# Altium PCB AudioMoth-v1.3.PcbDoc (part 1 of 4)
Units mil, origin at the board's own origin, x right, y up, seen from the top; angles counter-clockwise.
Board outline 4924.42 x 1891.72 mil, 4 copper layers (Top Layer, Layer 1, Layer 2, Bottom Layer), stack 61.651 mil thick; 157 components, 143 nets, 670 pads, 350 vias.
Unrouted connection lines stored in the file: 32.
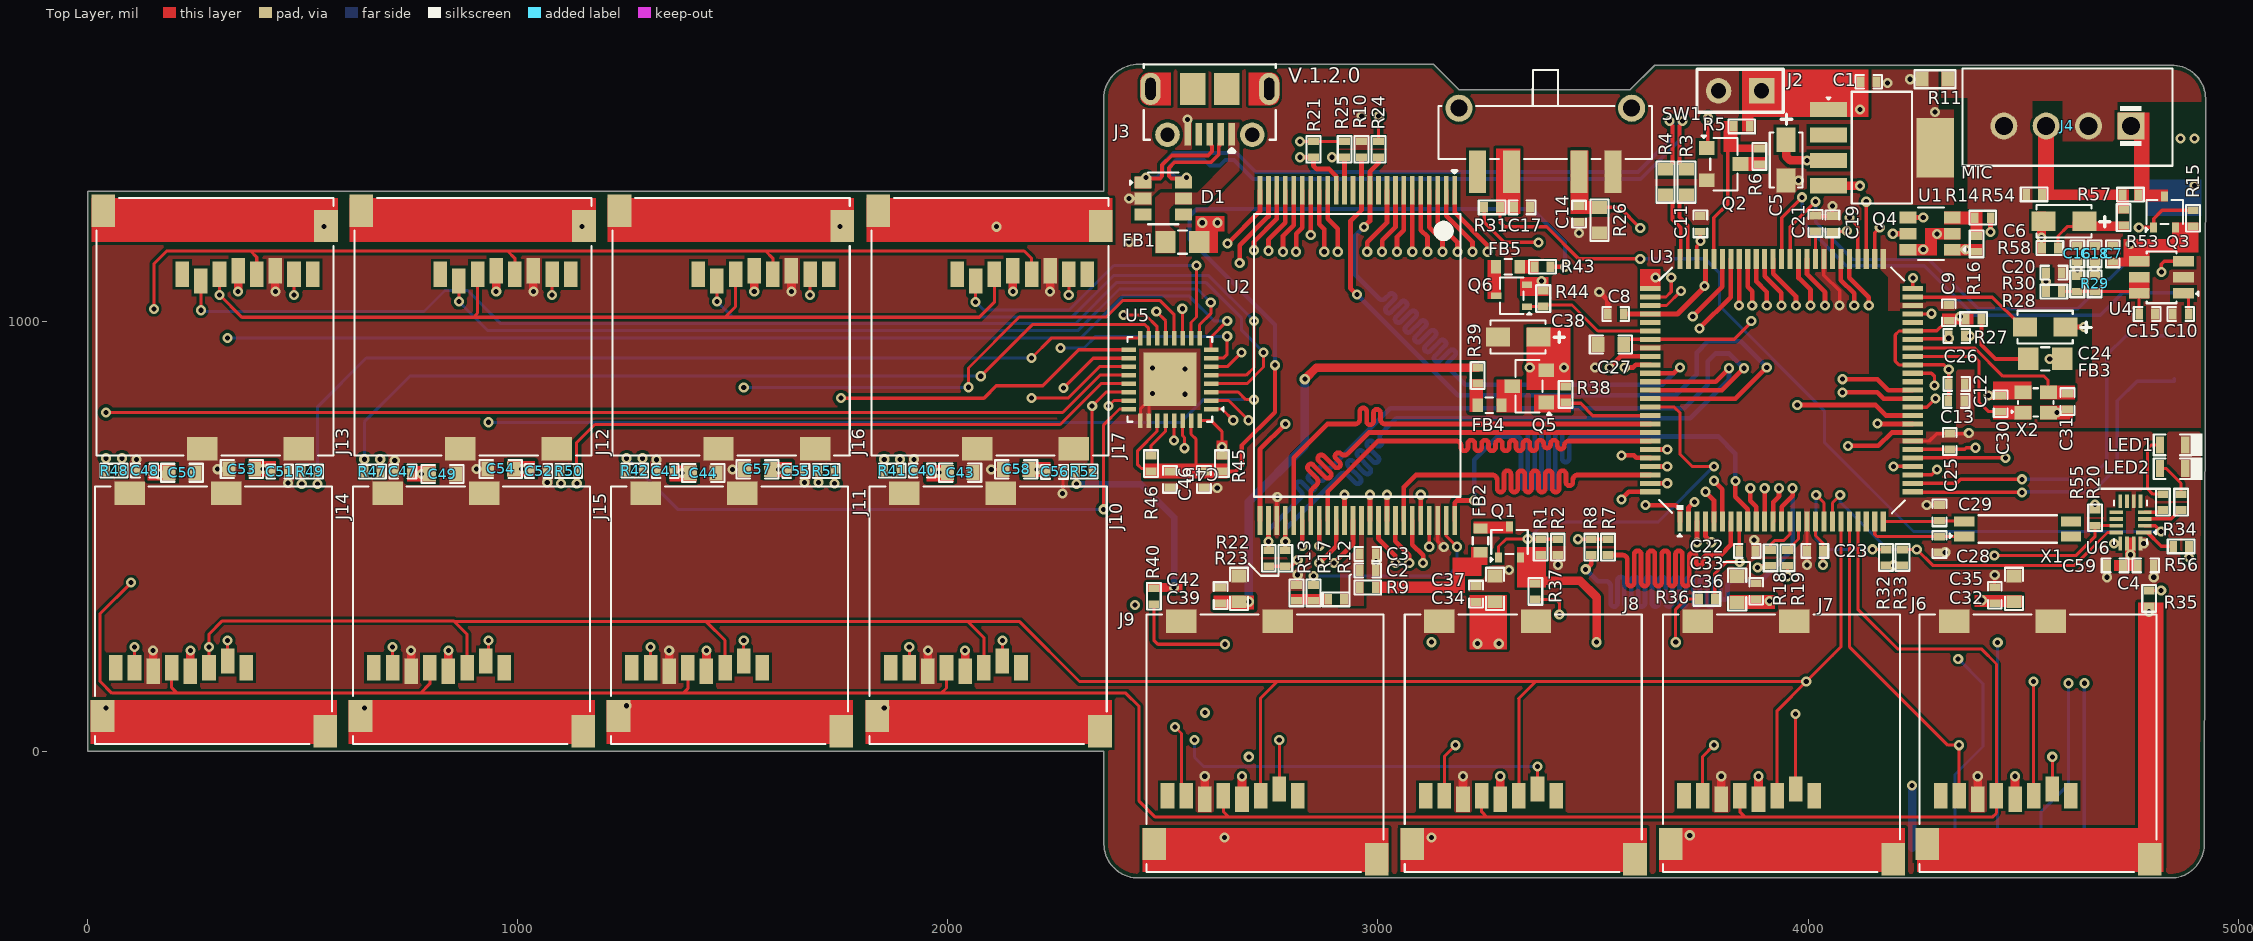
[diagram p0: Top Layer view]
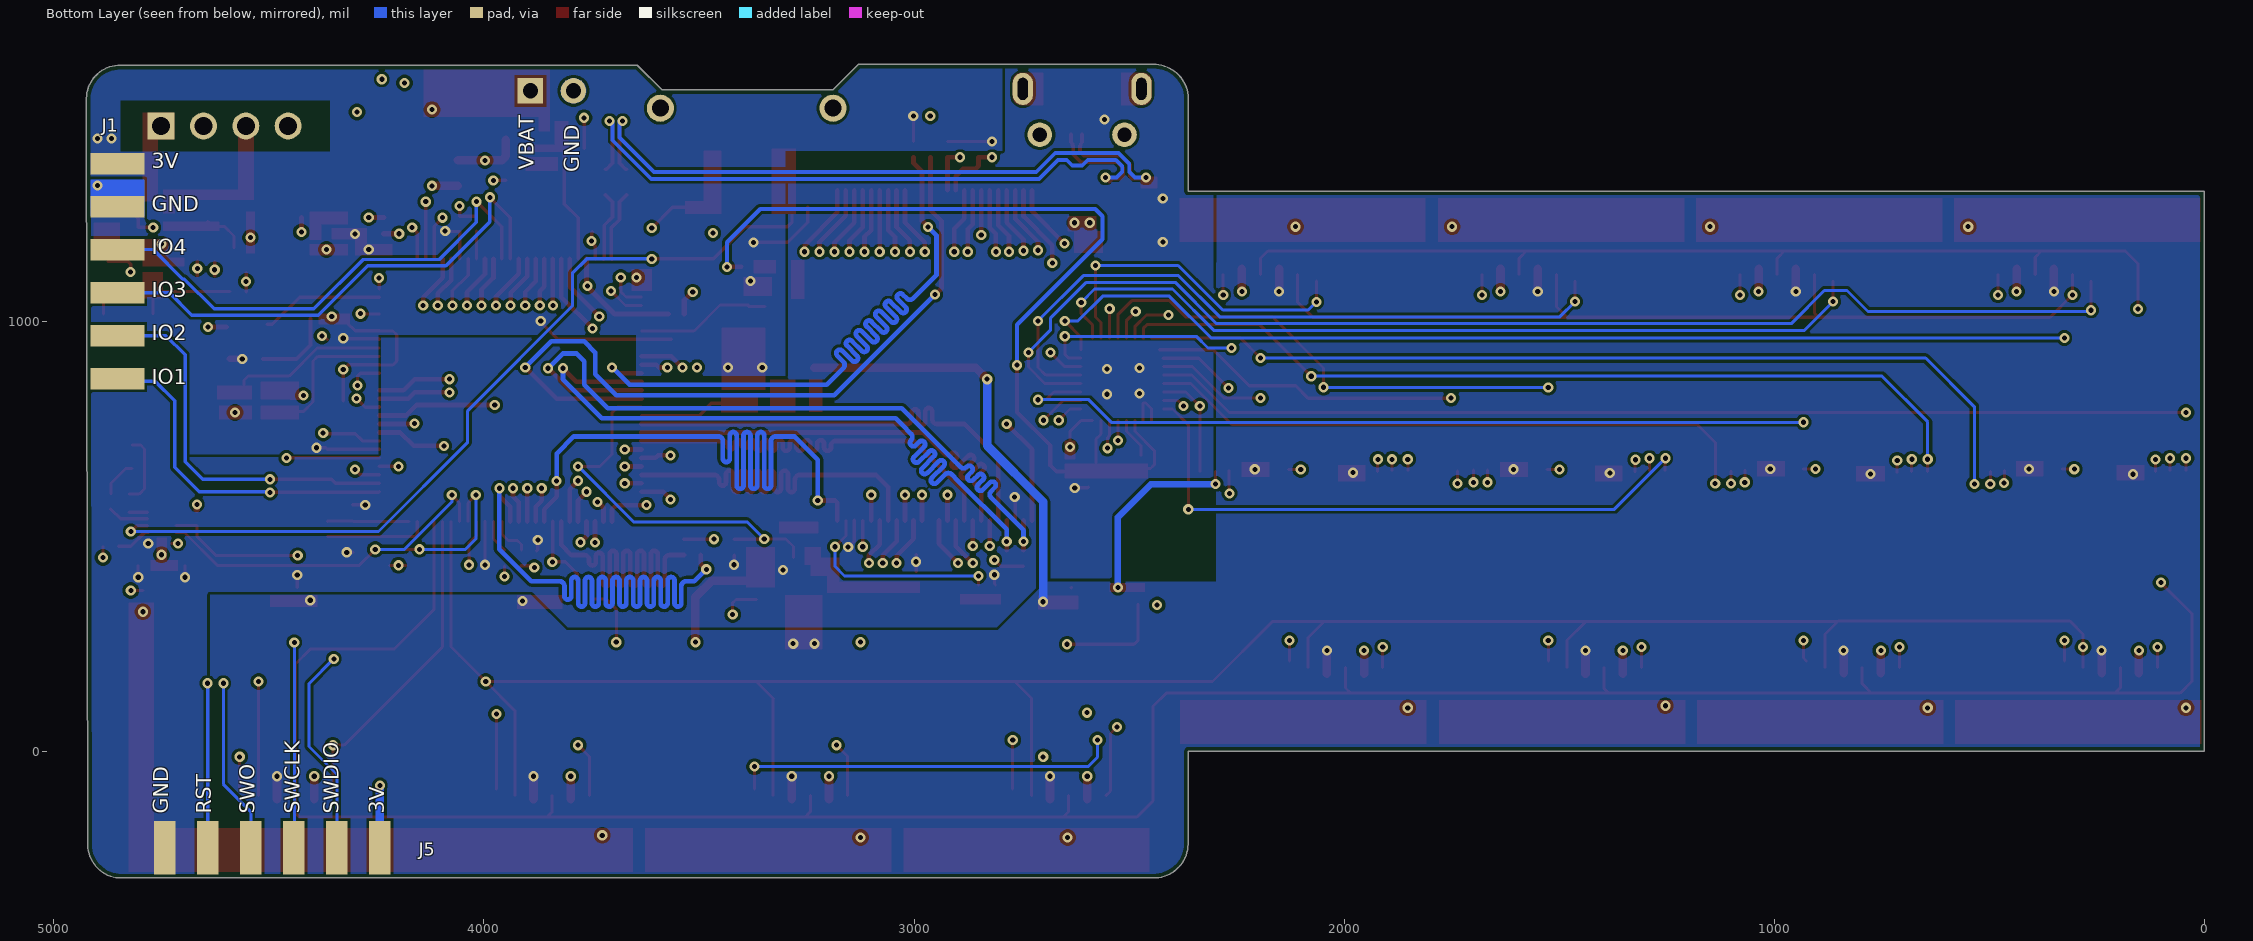
[diagram p1: Bottom Layer view, seen from below]
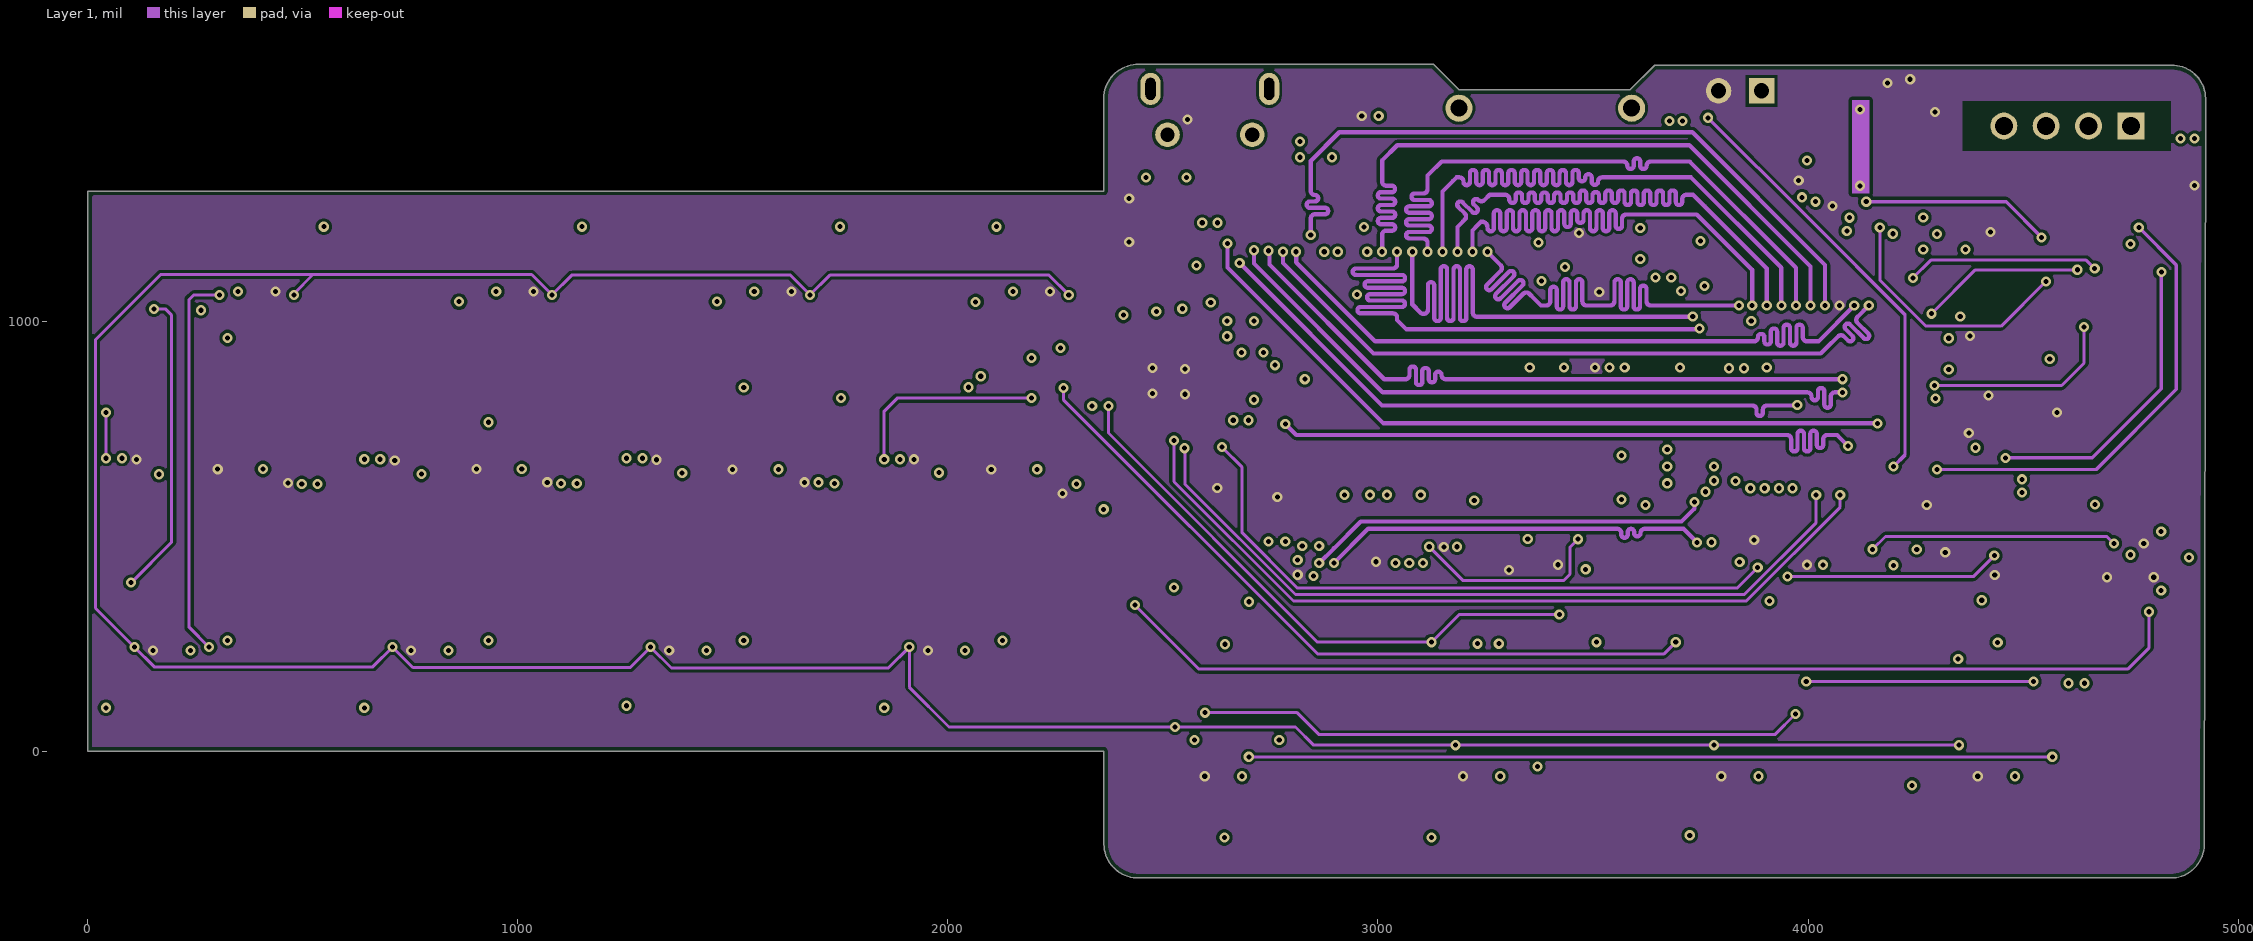
[diagram p2: Layer 1]
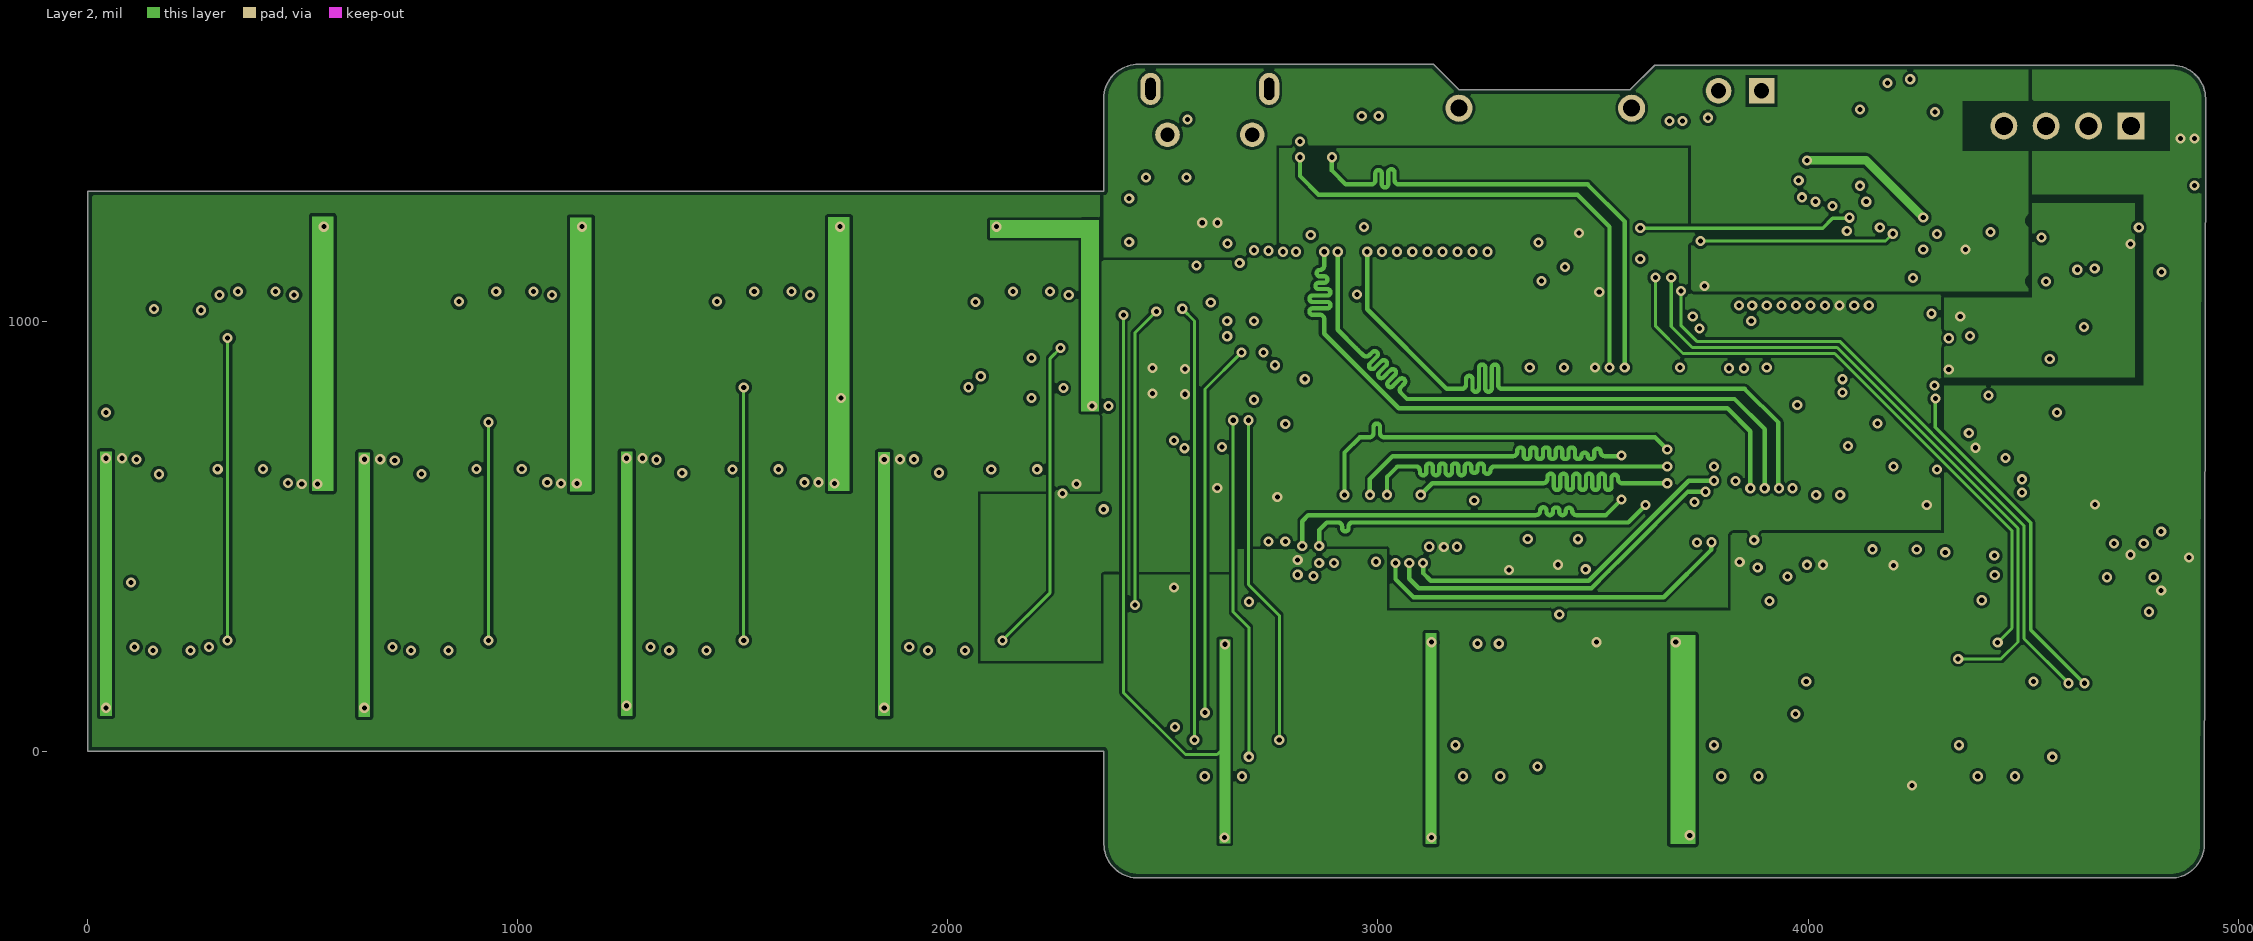
[diagram p3: Layer 2]
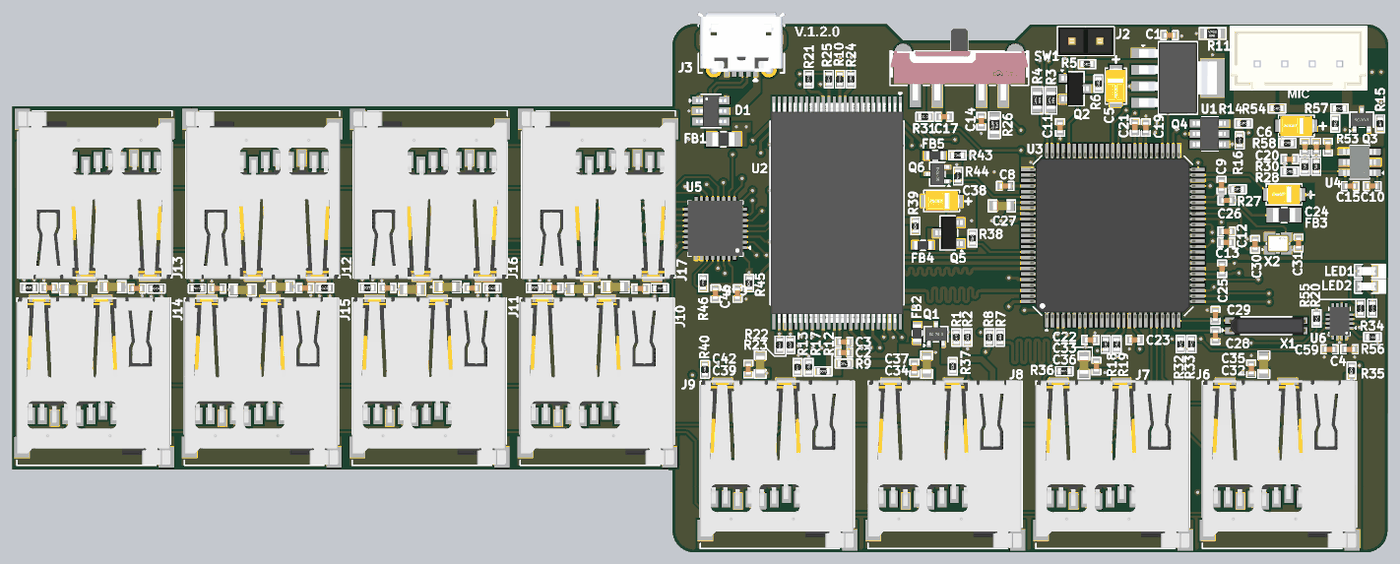
[diagram p6: 3D render of the assembled board from above, using the file's embedded part models]

## Layer stack, top to bottom
Top Solder: solder mask 0.787, Solder Resist, Dk 3.5
Top Layer: signal copper 1.378
Dielectric 2: prepreg 7.992, PP-006, Dk 4.1
Layer 1: signal copper 1.18
Dielectric 1: core 40.551, FR-4, Dk 4.8
Layer 2: signal copper 1.18
Dielectric 3: prepreg 7.992, PP-006, Dk 4.1
Bottom Layer: signal copper 1.378
Bottom Solder: solder mask 0.787, Solder Resist, Dk 3.5

## Board outline
0.4,0 2362.61,0 2362.61,-215.75 ccw(c2442.92,-214.17) 2444.5,-294.49 4841.65,-294.49 ccw(c4843.03,-216.34) 4921.18,-217.72 4924.31,1518.5 ccw(c4846.16,1517.12) 4844.78,1595.27 3643.32,1595.27 3586.23,1538.18 3188.59,1538.18 3129.53,1597.24 2443.99,1597.24 ccw(c2442.42,1516.92) 2362.1,1518.5 2362.1,1302.76 -0.1,1302.76

## Design rules (kind name [scope] priority, off if disabled: settings)
BoardOutlineClearance [All] p1: gap=0 ignorepadtopadclearanceinfootprint=FALSE except(10: Poly-OutlineEdge)
Clearance [All] p1: gap=7 ignorepadtopadclearanceinfootprint=TRUE except(0: Arc-Hole Track-Hole SMDPad-Hole THPad-Hole Via-Hole Fill-Hole Poly-Hole Region-Hole Text-Hole; 4: Arc-SMDPad Track-SMDPad SMDPad-SMDPad)
DiffPairsRouting [InDifferentialPairClass('USB_PROGRAM_LINES')] p1: maxlimit=7 minlimit=7 mostfreqgap=7 toplayer_minwidth=9 toplayer_maxwidth=9 toplayer_prefwidth=9 midlayer1_minwidth=7 midlayer1_maxwidth=7 midlayer1_prefwidth=7 midlayer2_minwidth=7 midlayer2_maxwidth=7 midlayer2_prefwidth=7 bottomlayer_minwidth=9 bottomlayer_maxwidth=9 bottomlayer_prefwidth=9 impedanceprofiledriven=TRUE impedanceprofileid={D0EDEC38-AB3E-4046-B400-208FF55D4031} impedanceprofilevalue=90.000000 maxuncoupledlength=500
HoleToHoleClearance [All] p1: gap=0 allowstackedmicrovias=TRUE
MatchedLengths "Schematic Matched Net Lengths" [InNetClass('USB_PROGRAM')] p1: tolerance=50 checknetsindiffpair=TRUE checkdiffpairvsdiffpair=FALSE checkxsignals=FALSE checkothers=FALSE
MaxMinImpedance "Schematic Impedance Constraint" [InNetClass('USB_PROGRAM')] p1: minimum=85.00 maximum=90.00
MinimumSolderMaskSliver [All] p1: minsoldermaskwidth=0
PolygonConnect [All] p1: connectstyle=Direct reliefconductorwidth=10 reliefentries=4 polygonreliefangle="90 Angle" airgapwidth=10
RoutingVias [All] p1: holewidth=11.81 width=23.62 viastyle="Through Hole" minholewidth=11.81 minwidth=23.62 maxholewidth=11.81 maxwidth=23.62
SilkToSilkClearance [All] p1: silktosilkclearance=0
SilkToSolderMaskClearance [IsPad] p1: minsilkscreentomaskgap=0 clearancetoexposedcopper=TRUE
SolderMaskExpansion [All] p1: expansion=4 istentingtop=FALSE
UnRoutedNet [All] p1: checkbadconnections=TRUE
Width Enable_lines [InNetClass('Enable_inputs')] p1: maxlimit=11 minlimit=9.9 preferedwidth=11 toplayer_minwidth=11 midlayer1_maxwidth=9.9 midlayer1_prefwidth=9.9 midlayer2_maxwidth=9.9 midlayer2_prefwidth=9.9 bottomlayer_minwidth=11 impedanceprofiledriven=TRUE impedanceprofileid={AF320795-CAEE-4F7B-B9B2-C18B4CC6FF60} impedanceprofilevalue=50.000000 minimp=50.000000 maximp=50.000000 favimp=50.000000
Width Byte_Control [InNetClass('Byte_control')] p2: maxlimit=11 minlimit=9.9 preferedwidth=11 toplayer_minwidth=11 midlayer1_maxwidth=9.9 midlayer1_prefwidth=9.9 midlayer2_maxwidth=9.9 midlayer2_prefwidth=9.9 bottomlayer_minwidth=11 impedanceprofiledriven=TRUE impedanceprofileid={AF320795-CAEE-4F7B-B9B2-C18B4CC6FF60} impedanceprofilevalue=50.000000 minimp=50.000000 maximp=50.000000 favimp=50.000000
Width Data_Lines [InNetClass('Data_Lines')] p3: maxlimit=11 minlimit=9.9 preferedwidth=11 toplayer_minwidth=11 midlayer1_maxwidth=9.9 midlayer1_prefwidth=9.9 midlayer2_maxwidth=9.9 midlayer2_prefwidth=9.9 bottomlayer_minwidth=11 impedanceprofiledriven=TRUE impedanceprofileid={AF320795-CAEE-4F7B-B9B2-C18B4CC6FF60} impedanceprofilevalue=50.000000 minimp=50.000000 maximp=50.000000 favimp=50.000000
Width Address_Lines_1 [InNetClass('Address_lines')] p4: maxlimit=11 minlimit=9.9 preferedwidth=11 toplayer_minwidth=11 midlayer1_maxwidth=9.9 midlayer1_prefwidth=9.9 midlayer2_maxwidth=9.9 midlayer2_prefwidth=9.9 bottomlayer_minwidth=11 impedanceprofiledriven=TRUE impedanceprofileid={AF320795-CAEE-4F7B-B9B2-C18B4CC6FF60} impedanceprofilevalue=50.000000 minimp=50.000000 maximp=50.000000 favimp=50.000000
Width [All] p5: maxlimit=40 minlimit=7 preferedwidth=7
24 further rules are at their usual default settings.

## Classes and differential pairs
differential pair class USB_PROGRAM_LINES: CPU_USB#_D CPU_USB_D
net class USB_PROGRAM: CPU_USB#_D_N CPU_USB#_D_P CPU_USB_D_N CPU_USB_D_P
component class Sheet2: C4 C32 C33 C34 C35 C36 C37 C38 C39 C40 C41 C42 C43 C44 C45 C46 C47 C48 C49 C50 C51 C52 C53 C54 C55 C56 C57 C58 C59 FB4 FB5 J6 J7 J8 J9 J10 J11 J12 J13 J14 J15 J16 J17 LED1 LED2 Q5 Q6 R20 R34 R35 R36 R37 R38 R39 R40 R41 R42 R43 R44 R45 R46 R47 R48 R49 R50 R51 R52 R55 R56 U5 U6
component class Sheet1: C1 C2 C3 C5 C6 C7 C8 C9 C10 C11 C12 C13 C14 C15 C16 C17 C18 C19 C20 C21 C22 C23 C24 C25 C26 C27 C28 C29 C30 C31 D1 FB1 FB2 FB3 J1 J2 J3 J4 J5 Q1 Q2 Q3 Q4 R1 R2 R3 R4 R5 R6 R7 R8 R9 R10 R11 R12 R13 R14 R15 R16 R17 R18 R19 R21 R22 R23 R24 R25 R26 R27 R28 R29 R30 R31 R32 R33 R53 R54 R57 R58 SW1 U1 U2 U3 U4 X1 X2
differential pair CPU_USB#_D: +CPU_USB#_D_P -CPU_USB#_D_N
differential pair CPU_USB_D: +CPU_USB_D_P -CPU_USB_D_N

## Components (designator, comment, footprint, x,y, rotation, side; value= is the part's Value field where it differs from the comment)
C1 "1uF" Cap-0402 4140.87,1556.78 r180 top
C2 "0.1uF" Cap-0402 2976.37,420.39 r0 top
C3 "0.1uF" Cap-0402 2976.37,458.78 r0 top
C4 "100nF" cap-0402 4785.29,432.32 r180 top
C5 "10uF" Case-A 3948.87,1374.78 r270 top
C6 "10uF" Case-A 4594.98,1232.4 r180 top
C7 "1uF" Cap-0402 4708.43,1156.71 r270 top
C8 "4.7uF" Cap-0402 3552.9,1016.89 r0 top
C9 "10nF" Cap-0402 4327,1019.57 r270 top
C10 "1uF" Cap-0402 4866.44,1016.8 r0 top
C11 "1uF" Cap-0402 3749.54,1226.31 r270 top
C12 "10nF" Cap-0402 4345.5,854.31 r180 top
C13 "10nF" Cap-0402 4344.36,814.94 r180 top
C14 "1uF" Cap-0402 3467.62,1249.3 r90 top
C15 "1uF" Cap-0402 4788.35,1016.8 r180 top
C16 "10nF" Cap-0402 4625.99,1156.71 r270 top
C17 "1uF" Cap-0402 3334.91,1264.81 r180 top
C18 "10nF" Cap-0402 4666.37,1156.71 r270 top
C19 "100nF" cap-0402 4056.59,1226.14 r270 top
C20 "10nF" Cap-0402 4571.48,1112.92 r180 top
C21 "1uF" Cap-0402 4017.22,1227.34 r270 top
C22 "100nF" cap-0402 3858.53,466.05 r180 top
C23 "100nF" cap-0402 4016.04,466.05 r0 top
C24 "10uF" Case-A 4551.32,986.57 r180 top
C25 "100nF" cap-0402 4329.36,720.42 r270 top
C26 "100nF" cap-0402 4345.5,965.71 r180 top
C27 "10uF" Cap-0603 3541.4,945.87 r0 top
C28 "9pF" Cap-0402 4305.5,481.27 r90 top
C29 "9pF" Cap-0402 4305.5,554.48 r270 top
C30 "7pF" Cap-0402 4447.56,808.17 r270 top
C31 "7pF" Cap-0402 4603.08,813.29 r90 top
C32 "100nF" cap-0402 4433.97,362.78 r270 top
C33 "100nF" cap-0402 3879.43,372.24 r270 top
C34 "100nF" cap-0402 3228.31,365.78 r270 top
C35 "10uF" Cap-0603 4478.5,377.78 r270 top
C36 "10uF" Cap-0603 3835.15,376.24 r270 top
C37 "10uF" Cap-0603 3272.28,377.78 r270 top
C38 "10uF" Case-A 3325.81,963.37 r180 top
C39 "100nF" cap-0402 2634.01,362.28 r270 top
C40 "100nF" cap-0402 1940.37,652.78 r0 top
C41 "100nF" cap-0402 1342.82,651.78 r0 top
C42 "10uF" Cap-0603 2676.87,377.78 r270 top
C43 "10uF" Cap-0603 2028.64,647.94 r180 top
C44 "10uF" Cap-0603 1431.18,646.94 r180 top
C45 "100nF" cap-0402 2516.24,632.1 r90 top
C46 "100nF" cap-0402 2595.18,632.1 r90 top
C47 "100nF" cap-0402 732.72,650.39 r0 top
C48 "100nF" cap-0402 132.24,652.69 r0 top
C49 "10uF" Cap-0603 824.87,644.78 r180 top
C50 "10uF" Cap-0603 219.32,647.68 r180 top
C51 "100nF" cap-0402 446.5,650.39 r180 top
C52 "100nF" cap-0402 1048.37,651.78 r180 top
C53 "10uF" Cap-0603 358.38,656.39 r0 top
C54 "10uF" Cap-0603 960.19,656.78 r0 top
C55 "100nF" cap-0402 1646.49,651.77 r180 top
C56 "100nF" cap-0402 2247.95,649.95 r180 top
C57 "10uF" Cap-0603 1557.14,655.78 r0 top
C58 "10uF" Cap-0603 2158.59,655.77 r0 top
C59 "100nF" cap-0402 4713.66,432.31 r0 top
D1 "IP4220CZ6,125" 6-TSOP 2500.8,1285.49 r0 top
FB1 "BLM21PG221SN1D" Ind-0805 2545.29,1184.1 r180 top
FB2 "BLM18HG601SN1D" "IND-0603 (1608 Metric)" 3238.31,490.56 r270 top
FB3 "CBW201209U102T" Ind-0805 4551.32,912.62 r0 top
FB4 "BLM18HG601SN1D" "IND-0603 (1608 Metric)" 3259.6,804.55 r180 top
FB5 "BLM18HG601SN1D" "IND-0603 (1608 Metric)" 3302.18,1126.78 r0 top
J1 "MA06-1SMD_BOARD_EDGE" TSM-106-X-SH-BOARDEDGE 4851.87,1116.78 r270 bottom
J2 "DNP" HDR1X2_ 3891.87,1535.78 r180 top
J3 "1050170001" 1050170001 2609.03,1487 r180 top locked
J4 "DNP" B4B-XH-A(LF)(SN). 4750.52,1454.02 r180 top
J5 "MA06-1SMD_BOARD_EDGE" TSM-106-X-SH-BOARDEDGE 4491.87,-224.22 r0 bottom
J6 "693071010811" 693071010811 4535.73,25.71 r0 top
J7 "693071010811" 693071010811 3939.27,25.71 r0 top
J8 "693071010811" 693071010811 3338.83,25.71 r0 top
J9 "693071010811" 693071010811 2738.4,25.71 r0 top
J10 "693071010811" 693071010811 2094.61,323.31 r0 top
J11 "693071010811" 693071010811 1493.16,323.31 r0 top
J12 "693071010811" 693071010811 893.16,323.31 r0 top
J13 "693071010811" 693071010811 293.16,323.31 r0 top
J14 "693071010811" 693071010811 295.16,980.31 r180 top
J15 "693071010811" 693071010811 895.16,980.31 r180 top
J16 "693071010811" 693071010811 1495.16,980.31 r180 top
J17 "693071010811" 693071010811 2096.61,980.31 r180 top
LED1 "RED" LED-0603 4847.77,712.57 r0 top
LED2 "Emerald" LED-0603 4847.77,657.24 r0 top
Q1 "LBSS84WT1G" SC-70 3305.87,486.78 r0 top
Q2 "BSS123" SOT-23 3803.59,1365.23 r270 top
Q3 "LBSS84WT1G" SC-70 4829,1254 r0 top
Q4 "FDC6420C" SuperSOT-6 4283.98,1203.5 r180 top
Q5 "DMG3415U" SOT-23 3351.79,848.78 r90 top
Q6 "LBSS84WT1G" SC-70 3310.96,1059.43 r90 top
R1 "10K" Res-0402 3378.33,474.81 r90 top
R2 "DNP" Res-0402 3418,474.81 r90 top
R3 "15R" Res-0603 3717.36,1323.51 r90 top
R4 "15R" Res-0603 3668.2,1323.51 r90 top
R5 "49.9K" Res-0402 3845.96,1453.31 r0 top value=49.9kR
R6 "49.9K" Res-0402 3886.87,1383.37 r90 top value=49.9kR
R7 "DNP" Res-0402 3534.9,474.81 r90 top
R8 "0R" Res-0402 3495.9,474.81 r90 top
R9 "1R" Res-0402 2976.37,381.02 r0 top
R10 "10K" Res-0402 2961.71,1399.75 r270 top
R11 "0R" Res-0603 4295.19,1562.78 r0 top
R12 "DNP" Res-0402 2902.66,353.5 r180 top
R13 "0R" Res-0402 2810.6,368.5 r270 top
R14 "6.8K" Res-0402 4406.02,1240.9 r180 top
R15 "10K" Res-0402 4895,1239.5 r90 top
R16 "4.7K" Res-0402 4391.82,1179.87 r90 top
R17 "10K" Res-0402 2849.97,368.5 r90 top
R18 "0R" Res-0402 3912.89,449.77 r90 top
R19 "0R" Res-0402 3952.26,449.78 r90 top
R20 "240R" Res-0402 4824.94,579.53 r90 top
R21 "10K" Res-0402 2849.95,1399.75 r270 top
R22 "10K" Res-0402 2746.09,448.76 r90 top
R23 "10K" Res-0402 2784.55,448.76 r90 top
R24 "10K" Res-0402 3001.08,1399.75 r270 top
R25 "10K" Res-0402 2922.34,1399.75 r270 top
R26 "270K" Res-0603 3514.87,1234.81 r90 top
R27 "1R" Res-0402 4384.86,1005.07 r180 top
R28 "1R" Res-0402 4626,1086.82 r270 top
R29 "1R" Res-0402 4666.37,1086.82 r270 top
R30 "1R" Res-0402 4571.48,1068.99 r0 top
R31 "10K" Res-0402 3265.18,1264.81 r180 top
R32 "4.7K" Res-0402 4181.15,451.05 r90 top
R33 "4.7K" Res-0402 4219.48,451.05 r90 top
R34 "133R" Res-0402 4867.31,579.53 r90 top
R35 "10K" Res-0402 4793,355.5 r270 top
R36 "10K" Res-0402 3764.9,354.5 r180 top
R37 "10K" Res-0402 3365.83,371.78 r270 top
R38 "10K" Res-0402 3436.44,830.05 r270 top
R39 "1R" Res-0402 3232.04,873.58 r270 top
R40 "10K" Res-0402 2478.87,360.78 r270 top
R41 "10K" Res-0402 1870.47,652.78 r180 top
R42 "10K" Res-0402 1271.83,652.78 r180 top
R43 "10K" Res-0402 3384.4,1052.84 r270 top
R44 "1R" Res-0402 3382.5,1126.78 r180 top
R45 "10K" Res-0402 2637.05,669.1 r270 top
R46 "10K" Res-0402 2472.35,669.1 r270 top
R47 "10K" Res-0402 661.86,650.39 r180 top
R48 "10K" Res-0402 61.37,652.69 r180 top
R49 "10K" Res-0402 515.75,650.39 r0 top
R50 "10K" Res-0402 1118.37,651.78 r0 top
R51 "10K" Res-0402 1717.36,651.77 r0 top
R52 "10K" Res-0402 2317,650.6 r0 top
R53 "0R" Res-0402 4733.85,1240.9 r90 top
R54 "DNP" Res-0402 4525.62,1294.95 r0 top
R55 "10K" Res-0402 4667.41,543.14 r90 top
R56 "10K" Res-0402 4867.31,476.56 r0 top
R57 "DNP" Res-0402 4749.35,1294.33 r0 top
R58 "DNP" Res-0402 4562.48,1170.37 r180 top
SW1 "SSSS711403" SSSS711403 3389.06,1421.52 r180 top locked
U1 "LP38692MPX-3.3/NOPB" SOT-223-5 4171.47,1403.48 r270 top
U2 "IS62WV102416DBLL-55TLI-TR" "48-TSOP I" 2951.87,920.78 r270 top
U3 "EFM32WG380F256-B-QFP100R" EFM32WG380F256-B-QFP100R 3938.48,839.72 r90 top
U4 "MAX6070BAUT25+T" SOT-23-6 4821.43,1102 r180 top
U5 "TCA6424ARGJR" "32-UQFN (5x5)" 2516.24,864.78 r180 top
U6 "TCA6408ARSVR" "16-UQFN (2.6x1.8)" 4749.55,532.52 r180 top
X1 "32.768 KHz" MC-146_ 4487.5,516.98 r0 top
X2 "48 MHz" SMD2016-4P 4529.45,811.32 r0 top

## Footprints (in the part's own frame and the unit in brackets; to place one, negate y for a bottom-side part, rotate by r counter-clockwise, add the part's x,y. Pads: shape width x height; smd on the part's side, far side on the other; paste and mask are expansions set on the pad)
6-TSOP [mm]
  rect 1x0.7 smd paste+0 mask+0.051: 1(-1.2,0.95) 2(-1.2,0) 3(-1.2,-0.95) 4(1.2,-0.95) 5(1.2,0) 6(1.2,0.95)
  silkscreen extent -1.96,-1.52 0.9,1.52, body extent -1.38,-1.45 1.38,1.45, height 1.1
"16-UQFN (2.6x1.8)" [mm]
  rect 0.91x0.22 smd mask+0.07: 1(-0.795,0.6)
  rect 0.81x0.22 smd mask+0.07: 2(-0.845,0.2) 3(-0.845,-0.2) 4(-0.845,-0.6) 9(0.845,-0.6) 10(0.845,-0.2) 11(0.845,0.2) 12(0.845,0.6)
  rect 0.22x0.81 smd mask+0.07: 5(-0.6,-1.245) 6(-0.2,-1.245) 7(0.2,-1.245) 8(0.6,-1.245) 13(0.6,1.245) 14(0.2,1.245) 15(-0.2,1.245) 16(-0.6,1.245)
  silkscreen extent -1.51,-1.27 0.98,1.27, body extent -0.9,-1.3 0.9,1.3, height 0.55
"32-UQFN (5x5)" [mm]
  rect 0.86x0.27 smd: 1(-2.435,1.75) 2(-2.435,1.25) 3(-2.435,0.75) 4(-2.435,0.25) 5(-2.435,-0.25) 6(-2.435,-0.75) 7(-2.435,-1.25) 8(-2.435,-1.75) 17(2.435,-1.75) 18(2.435,-1.25) 19(2.435,-0.75) 20(2.435,-0.25) 21(2.435,0.25) 22(2.435,0.75) 23(2.435,1.25) 24(2.435,1.75)
  rect 0.27x0.86 smd: 9(-1.75,-2.435) 10(-1.25,-2.435) 11(-0.75,-2.435) 12(-0.25,-2.435) 13(0.25,-2.435) 14(0.75,-2.435) 15(1.25,-2.435) 16(1.75,-2.435) 25(1.75,2.435) 26(1.25,2.435) 27(0.75,2.435) 28(0.25,2.435) 29(-0.25,2.435) 30(-0.75,2.435) 31(-1.25,2.435) 32(-1.75,2.435)
  rect 3.15x3.15 smd paste-3: 33(0,0)
  silkscreen extent -3.17,-2.5 2.5,2.5, body extent -2.5,-2.5 2.5,2.5, height 0.6
"48-TSOP I" [mm]
  rect 1.7x0.28 smd paste+0 mask+0.051: 1(-9.75,5.75) 2(-9.75,5.25) 3(-9.75,4.75) 4(-9.75,4.25) 5(-9.75,3.75) 6(-9.75,3.25) 7(-9.75,2.75) 8(-9.75,2.25) 9(-9.75,1.75) 10(-9.75,1.25) 11(-9.75,0.75) 12(-9.75,0.25) 13(-9.75,-0.25) 14(-9.75,-0.75) 15(-9.75,-1.25) 16(-9.75,-1.75) 17(-9.75,-2.25) 18(-9.75,-2.75) 19(-9.75,-3.25) 20(-9.75,-3.75) 21(-9.75,-4.25) 22(-9.75,-4.75) 23(-9.75,-5.25) 24(-9.75,-5.75) 25(9.75,-5.75) 26(9.75,-5.25) 27(9.75,-4.75) 28(9.75,-4.25) 29(9.75,-3.75) 30(9.75,-3.25) 31(9.75,-2.75) 32(9.75,-2.25) 33(9.75,-1.75) 34(9.75,-1.25) 35(9.75,-0.75) 36(9.75,-0.25) 37(9.75,0.25) 38(9.75,0.75) 39(9.75,1.25) 40(9.75,1.75) 41(9.75,2.25) 42(9.75,2.75) 43(9.75,3.25) 44(9.75,3.75) 45(9.75,4.25) 46(9.75,4.75) 47(9.75,5.25) 48(9.75,5.75)
  silkscreen extent -10.9,-6.1 8.35,6.1, body extent -10,-6 10,6, height 1.25
1050170001 [mm]
  rect 0.4x1.35 smd mask+0.064: 1(-1.3,1.325) 2(-0.65,1.325) 3(0,1.325) 4(0.65,1.325) 5(1.3,1.325)
  round 1.45 hole 0.85 mask+0.064: SH1(-2.5,1.35) SH2(2.5,1.35)
  oval 1.2x1.9 hole 0.6 slot 1.3 at 90 deg mask+0: SH3(-3.5,-1.35) SH6(3.5,-1.35)
  rect 1.5x1.9 smd mask+0.064: SH4(-1,-1.35) SH5(1,-1.35)
  Top Layer region: 3.626,-0.401 3.652,-0.403 3.678,-0.406 3.704,-0.411 3.729,-0.417 3.755,-0.424 3.779,-0.433 3.803,-0.443 3.827,-0.454 3.85,-0.467 3.872,-0.481 3.894,-0.495 3.915,-0.511 3.935,-0.528 3.954,-0.546 3.972,-0.565 3.989,-0.585 4.005,-0.606 4.019,-0.628 4.033,-0.65 4.046,-0.673 4.057,-0.697 4.067,-0.721 4.076,-0.745 4.083,-0.771 4.089,-0.796 4.094,-0.822 4.097,-0.848 4.099,-0.874 4.1,-0.9 4.1,-1.8 4.099,-1.826 4.097,-1.852 4.094,-1.878 4.089,-1.904 4.083,-1.929 4.076,-1.955 4.067,-1.979 4.057,-2.003 4.046,-2.027 4.033,-2.05 4.019,-2.072 4.005,-2.094 3.989,-2.115 3.972,-2.135 3.954,-2.154 3.935,-2.172 3.915,-2.189 3.894,-2.205 3.872,-2.219 3.85,-2.233 3.827,-2.246 3.803,-2.257 3.779,-2.267 3.755,-2.276 3.729,-2.283 3.704,-2.289 3.678,-2.294 3.652,-2.297 3.626,-2.299 3.6,-2.3 2.3,-2.3 2.3,-0.4 3.6,-0.4
  Top Layer region: -2.3,-2.3 -3.6,-2.3 -3.626,-2.299 -3.652,-2.297 -3.678,-2.294 -3.704,-2.289 -3.729,-2.283 -3.755,-2.276 -3.779,-2.267 -3.803,-2.257 -3.827,-2.246 -3.85,-2.233 -3.872,-2.219 -3.894,-2.205 -3.915,-2.189 -3.935,-2.172 -3.954,-2.154 -3.972,-2.135 -3.989,-2.115 -4.005,-2.094 -4.019,-2.072 -4.033,-2.05 -4.046,-2.027 -4.057,-2.003 -4.067,-1.979 -4.076,-1.955 -4.083,-1.929 -4.089,-1.904 -4.094,-1.878 -4.097,-1.852 -4.099,-1.826 -4.1,-1.8 -4.1,-0.9 -4.099,-0.874 -4.097,-0.848 -4.094,-0.822 -4.089,-0.796 -4.083,-0.771 -4.076,-0.745 -4.067,-0.721 -4.057,-0.697 -4.046,-0.673 -4.033,-0.65 -4.019,-0.628 -4.005,-0.606 -3.989,-0.585 -3.972,-0.565 -3.954,-0.546 -3.935,-0.528 -3.915,-0.511 -3.894,-0.495 -3.872,-0.481 -3.85,-0.467 -3.827,-0.454 -3.803,-0.443 -3.779,-0.433 -3.755,-0.424 -3.729,-0.417 -3.704,-0.411 -3.678,-0.406 -3.652,-0.403 -3.626,-0.401 -3.6,-0.4 -2.3,-0.4
  silkscreen extent -3.9,-2.8 3.9,2.36, body extent -4,-3.84 4,1.56, height 2.75
693071010811 [mm]
  rect 0.8x1.5 smd paste+0 mask+0.05: 1(1.915,-3.275) 2(0.815,-2.875) 3(-0.285,-3.275) 4(-1.385,-3.475) 5(-2.485,-3.275) 6(-3.585,-3.475) 7(-4.685,-3.275) 8(-5.785,-3.275)
  rect 1.4x1.9 smd paste+0 mask+0.05: 9(-6.575,-6.125) 9(6.575,-7.025)
  rect 1.8x1.4 smd paste+0 mask+0.05: 10(-4.975,7.025) 10(0.725,7.025)
  silkscreen extent -7.02,-7.77 6.97,7.43, body extent -7.06,-7.69 6.94,7.51, height 1.83
B4B-XH-A(LF)(SN). [mm]
  rect 1.59x1.59 hole 1.06: 1(0,0)
  round 1.59 hole 1.06: 2(2.5,0) 3(5,0) 4(7.5,0)
  silkscreen extent -2.45,-3.4 9.95,2.35, body extent -2.45,-3.4 9.95,2.35, height 7
Cap-0402 [mil]
  rect 18x25 smd mask+2.36: 1(-18.5,0) 2(18.5,0)
  silkscreen extent -31,-16 31,16, body extent -20,-10 20,10, height 19
cap-0402 [mil]
  rect 18x25 smd mask+2.36: 1(-18.5,0) 2(18.5,0)
  silkscreen extent -31,-16 31,16, body extent -20,-10 20,10, height 19
Cap-0603 [mil]
  rect 30x35 smd mask+2.36: 1(-30,0) 2(30,0)
  silkscreen extent -49,-21 49,21, body extent -32,-16 31,16, height 34
Case-A [mm]
  rect 1.42x1.13 smd: 1(-1.2,0) 2(1.2,0)
  silkscreen extent -2.72,-0.97 1.63,0.97, body extent -1.6,-0.9 1.6,0.9, height 1.8
EFM32WG380F256-B-QFP100R [mm]
  rect 1.2x0.3 smd: 1(-7.75,6) 2(-7.75,5.5) 3(-7.75,5) 4(-7.75,4.5) 5(-7.75,4) 6(-7.75,3.5) 7(-7.75,3) 8(-7.75,2.5) 9(-7.75,2) 10(-7.75,1.5) 11(-7.75,1) 12(-7.75,0.5) 13(-7.75,0) 14(-7.75,-0.5) 15(-7.75,-1) 16(-7.75,-1.5) 17(-7.75,-2) 18(-7.75,-2.5) 19(-7.75,-3) 20(-7.75,-3.5) 21(-7.75,-4) 22(-7.75,-4.5) 23(-7.75,-5) 24(-7.75,-5.5) 25(-7.75,-6) 51(7.75,-6) 52(7.75,-5.5) 53(7.75,-5) 54(7.75,-4.5) 55(7.75,-4) 56(7.75,-3.5) 57(7.75,-3) 58(7.75,-2.5) 59(7.75,-2) 60(7.75,-1.5) 61(7.75,-1) 62(7.75,-0.5) 63(7.75,0) 64(7.75,0.5) 65(7.75,1) 66(7.75,1.5) 67(7.75,2) 68(7.75,2.5) 69(7.75,3) 70(7.75,3.5) 71(7.75,4) 72(7.75,4.5) 73(7.75,5) 74(7.75,5.5) 75(7.75,6)
  rect 0.3x1.2 smd: 26(-6,-7.75) 27(-5.5,-7.75) 28(-5,-7.75) 29(-4.5,-7.75) 30(-4,-7.75) 31(-3.5,-7.75) 32(-3,-7.75) 33(-2.5,-7.75) 34(-2,-7.75) 35(-1.5,-7.75) 36(-1,-7.75) 37(-0.5,-7.75) 38(0,-7.75) 39(0.5,-7.75) 40(1,-7.75) 41(1.5,-7.75) 42(2,-7.75) 43(2.5,-7.75) 44(3,-7.75) 45(3.5,-7.75) 46(4,-7.75) 47(4.5,-7.75) 48(5,-7.75) 49(5.5,-7.75) 50(6,-7.75) 76(6,7.75) 77(5.5,7.75) 78(5,7.75) 79(4.5,7.75) 80(4,7.75) 81(3.5,7.75) 82(3,7.75) 83(2.5,7.75) 84(2,7.75) 85(1.5,7.75) 86(1,7.75) 87(0.5,7.75) 88(0,7.75) 89(-0.5,7.75) 90(-1,7.75) 91(-1.5,7.75) 92(-2,7.75) 93(-2.5,7.75) 94(-3,7.75) 95(-3.5,7.75) 96(-4,7.75) 97(-4.5,7.75) 98(-5,7.75) 99(-5.5,7.75) 100(-6,7.75)
  silkscreen extent -8.64,-7.27 7.24,7.24, body extent -8,-8 8,8, height 1.6
HDR1X2_ [mm] "CONN HEADER VERT 2POS 2.54MM"
  rect 1.5x1.5 hole 0.9: 1(0,0)
  round 1.5 hole 0.9: 2(2.54,0)
  silkscreen extent -1.27,-1.27 3.81,1.27, body extent -1.27,-1.27 3.81,1.27, height 8.44
"IND-0603 (1608 Metric)" [mm] "0.063\" L x 0.032\" W (1.60mm x 0.80mm)"
  rect 0.6x0.8 smd: 1(-0.7,0) 2(0.7,0)
  silkscreen extent -0.2,-0.46 0.23,0.46, body extent -0.8,-0.4 0.8,0.4, height 0.78
Ind-0805 [mm] "Inductor 0805"
  rect 1.2x1.32 smd: 1(-1,0) 2(1,0)
  silkscreen extent -0.25,-0.69 0.25,0.69, body extent -1,-0.62 1,0.63, height 0.47
LED-0603 [mm]
  rect 0.5x1 smd: 1(-0.75,0) 2(0.75,0)
  silkscreen extent -1.12,-0.66 1.75,0.66, body extent -0.82,-0.37 0.82,0.36, height 0.68
MC-146_ [mm]
  rect 1.2x0.6 smd: 1(-3.15,-0.45) 2(3.15,-0.45) 3(3.15,0.45) 4(-3.15,0.45)
  silkscreen extent -4.01,-0.81 2.31,0.81, body extent -3.35,-0.75 3.55,0.75, height 1.45
Res-0402 [mil]
  rect 18x25 smd mask+2.17: 1(-18.5,0) 2(18.5,0)
  silkscreen extent -32,-17 32,16, body extent -23,-11 23,11, height 16
Res-0603 [mil]
  rect 30x35 smd: 1(-30,0) 2(30,0)
  silkscreen extent -48,-21 48,21, body extent -31,-17 31,17, height 18
SC-70 [mm]
  rect 0.4x0.6 smd paste+0 mask+0.051: 1(-0.65,-0.91) 2(0.65,-0.91) 3(0,0.91)
  silkscreen extent -1.11,-1.16 1.08,0.7, body extent -1,-1.05 1,1.05, height 1
SMD2016-4P [mm]
  rect 1x0.8 smd paste+0 mask+0.051: 1(-0.75,-0.6) 2(0.75,-0.6) 3(0.75,0.6) 4(-0.75,0.6)
  silkscreen extent -1.42,-0.84 1.04,0.84, body extent -1,-0.8 1,0.8, height 0.47
SOT-23 [mm] "TRANS NPN 40V 0.6A SOT23"
  rect 0.82x0.92 smd: 1(-0.95,-1) 2(0.95,-1) 3(0,1)
  silkscreen extent -1.68,-1.3 1.55,0.81, body extent -1.5,-1.25 1.5,1.25, height 1.05
SOT-23-6 [mm]
  rect 1.22x0.62 smd: 1(-1.31,0.95) 2(-1.31,0) 3(-1.31,-0.95) 4(1.31,-0.95) 5(1.31,0) 6(1.31,0.95)
  silkscreen extent -2.18,-1.52 0.86,1.52, body extent -1.5,-1.5 1.5,1.5, height 1.47
SOT-223-5 [mm]
  rect 0.9x2.2 smd paste+0 mask+0.051: 1(-2.25,-3.15) 2(-0.75,-3.15) 3(0.75,-3.15) 4(2.25,-3.15)
  rect 3.5x2.2 smd paste+0 mask+0.051: 5(0,3.15)
  silkscreen extent -3.3,-3.28 3.3,1.78, body extent -3.25,-3.52 3.25,3.52, height 1.8
SSSS711403 [mm]
  rect 1x2.5 smd paste-100 mask+0.051: 1(-4,1.875) 2(-2,1.875) 3(2,1.875) 4(4,1.875)
  round 1.6 hole 1 paste-2539.97 mask+0.051: 5(-5.1,-1.875) 6(5.1,-1.875)
  silkscreen extent -6.3,-4.14 6.3,1.12, body extent -6.25,-4 6.25,2.5, height 2.03
SuperSOT-6 [mm]
  rect 1x0.7 smd: 1(-1.3,0.95) 2(-1.3,0) 3(-1.3,-0.95) 4(1.3,-0.95) 5(1.3,0) 6(1.3,0.95)
  silkscreen extent -2.09,-1.55 0.71,1.55, body extent -1.5,-1.5 1.5,1.5, height 1.05
TSM-106-X-SH-BOARDEDGE [mil] "TSM-106-X-SH-BOARDEDGE"
  rect 50x125 smd: 1(-250,0) 2(-150,0) 3(-50,0) 4(50,0) 5(150,0) 6(250,0)

## Part data
C1 C7 C10 C11 C14 C15 C17 C21: library part CL05A105KA5NQNC, "CAP CER 1UF 25V X5R 0402", Case Code (Imperial)=0402, Case Code (Metric)=1005, Dielectric=X5R, LCSC Part Number=C52923, Manufacturer=Samsung, Max Operating Temperature=85°C, Min Operating Temperature=-55°C, Package Quantity=10000, Tolerance=10%, Voltage Rating=25V, Case/Package=0402, Category="Ceramic Capacitors", ComponentLink1Description=https://datasheet.ciiva.com/25720/cl05a105ka5nqnc-25720771.pdf?src-supplier=Digi-Key, ComponentLink1URL=https://datasheet.ciiva.com/25720/cl05a105ka5nqnc-25720771.pdf?src-supplier=Digi-Key, ComponentLink2Description=https://datasheet.ciiva.com/3777/cl05a105ka5nqnc-3777709.pdf?src-supplier=Arrow+Electronics, ComponentLink2URL=https://datasheet.ciiva.com/3777/cl05a105ka5nqnc-3777709.pdf?src-supplier=Arrow+Electronics, ComponentLink3Description=https://datasheet.ciiva.com/29198/459147-da-01-en-vs-kondensator-0402-29198339.pdf?src-supplier=Conrad, ComponentLink3URL=https://datasheet.ciiva.com/29198/459147-da-01-en-vs-kondensator-0402-29198339.pdf?src-supplier=Conrad, Construction=Flat, Depth=0.5mm, Height=0.5mm, Item Type=Capacitor, Lead Free="Lead Free", Length=1mm, Manufacturer Part Number=CL05A105KA5NQNC, Material=Ceramic, Mounting Technology="Surface Mount", Packaging="Tape and Reel", Pricing 1="10000=0.0256, 20000=0.0238, 30000=0.0228, 50000=0.0207, 100000=0.0175, 250000=0.0157 (USD)", Radiation Hardening=No, RoHS=Yes, RoHS Compliant=Yes, Series=CL, Stock 1=80000, Supplier 1="Arrow Electronics", Supplier Part Number 1=CL05A105KA5NQNC, Thickness=0.022inch, Width=0.02inch
C2 C3: library part CL05B104KB54PNC, "CAP CER 0.1UF 50V X7R 0402", LCSC Part Number=C307331, Manufacturer=Samsung, Supplier Part Number 1=1276-CL05B104KB54PNCDKR-ND, Item Type=Capacitor, Manufacturer Part Number=CL05B104KB54PNC, Pricing 1="1=0.1, 10=0.067, 50=0.0366, 100=0.0299, 500=0.02138, 1000=0.01681, 2500=0.01528, 5000=0.01406 (USD)", Stock 1=8594, Supplier 1=Digi-Key
C4 C19 C22 C23 C25 C26 C32 C33 C34 C39 C40 C41 C45 C46 C47 C48 C51 C52 C55 C56 C59: library part C1005X7R1H104KT000F, "CAP CER 0.1UF 50V X7R 0402", Dielectric=X7R, LCSC Part Number=C361198, Manufacturer=TDK, Tolerance=10%, Voltage=25V, Category="Ceramic Capacitors", ComponentLink1Description=LCSC, ComponentLink1URL=https://www.lcsc.com/product-detail/Multilayer-Ceramic-Capacitors-MLCC-SMD-SMT_TDK-C1005X7R1H104KT000F_C361198.html, Item Type=Capacitor, Manufacturer Part Number=C1005X7R1H104KT000F, RoHS=No, Supplier 1=Avnet, Supplier Part Number 1=C1005X7R1H104KT000F
C5 C6 C24 C38: library part CA45-A-16V-10uF-K, "10uF 16V 2Ω@100kHz ±10% CASE-A-3216-16(mm) Tantalum Capacitors ROHS", LCSC Part Number=C185774, Manufacturer=TORCH, Manufacturer Part Number=CA45-A-16V-10μF-K, Package=CASE-A-3216-16(mm), ComponentLink1Description=LCSC, ComponentLink1URL=https://www.lcsc.com/product-detail/Tantalum-Capacitors_TORCH-CA45-A-16V-10-F-K_C185774.html, Item Type=Capacitors
C8: library part CL05A475MO5NUNC, "CAP CER 4.7UF 16V X5R 0402", Case Code (Imperial)=0402, Case Code (Metric)=1005, Manufacturer=Samsung, Max Operating Temperature=85°C, Min Operating Temperature=-55°C, Tolerance=20%, Voltage Rating=16V, Capacitance=4.7uF, Case/Package=0402, Category="Ceramic Capacitors", ComponentLink1Description=http://www.farnell.com/datasheets/2710653.pdf?src-supplier=Farnell, ComponentLink1URL=http://www.farnell.com/datasheets/2710653.pdf?src-supplier=Farnell, ComponentLink2Description=http://www.samsungsem.com/kr/support/product-search/mlcc/CL05A475MO5NUNC.jsp?src-supplier=Digikey, ComponentLink2URL=http://www.samsungsem.com/kr/support/product-search/mlcc/CL05A475MO5NUNC.jsp?src-supplier=Digikey, ComponentLink3Description=http://www.farnell.com/datasheets/2710653.pdf?src-supplier=Element14, ComponentLink3URL=http://www.farnell.com/datasheets/2710653.pdf?src-supplier=Element14, ComponentLink4Description=https://datasheet.octopart.com/CL05A475MO5NUNC-Samsung-Electro-Mechanics-datasheet-123102911.pdf?src-supplier=Future+Electronics, ComponentLink4URL=https://datasheet.octopart.com/CL05A475MO5NUNC-Samsung-Electro-Mechanics-datasheet-123102911.pdf?src-supplier=Future+Electronics, ComponentLink5Description=http://www.farnell.com/datasheets/2710653.pdf?src-supplier=Newark, ComponentLink5URL=http://www.farnell.com/datasheets/2710653.pdf?src-supplier=Newark, Height=550um, Length=0.039inch, Manufacturer Part Number=CL05A475MO5NUNC, Material=4241ConductorMaterial, Mount="Surface Mount", Packaging="Cut Tape", Pricing 1="10000=0.09712 (USD)", RoHS=Yes, RoHS Compliant=Yes, Series=CL, Stock 1=50000, Supplier 1=Avnet, Supplier Part Number 1=CL05A475MO5NUNC, Thickness=0.022inch, Voltage Rating (DC)=16V, Width=0.02inch
C9 C12 C13 C16 C18 C20: library part CC0402KRX7R9BB103, "CAP CER 10000PF 50V X7R 0402", Case Code (Imperial)=0402, Case Code (Metric)=1005, Dielectric=X7R, LCSC Part Number=C60133, Manufacturer=Yageo, Max Operating Temperature=125°C, Min Operating Temperature=-55°C, Package Quantity=1, Resistor Type=Ceramic, Tolerance=10%, Voltage=50V, Capacitance=10nF, Case/Package=0402, Category="Ceramic Capacitors", ComponentLink1Description=https://datasheet.ciiva.com/11788/0900766b8079c870-11788375.pdf?src-supplier=RSComponents, ComponentLink1URL=https://datasheet.ciiva.com/11788/0900766b8079c870-11788375.pdf?src-supplier=RSComponents, ComponentLink2Description=https://datasheet.ciiva.com/26862/getdatasheetpartid-138248-26862642.pdf?src-supplier=Verical, ComponentLink2URL=https://datasheet.ciiva.com/26862/getdatasheetpartid-138248-26862642.pdf?src-supplier=Verical, ComponentLink3Description=https://datasheet.ciiva.com/7978/1489800-7978093.pdf?src-supplier=Element14, ComponentLink3URL=https://datasheet.ciiva.com/7978/1489800-7978093.pdf?src-supplier=Element14, ComponentLink4Description=https://datasheet.ciiva.com/28450/1489800-28450377.pdf?src-supplier=Element14, ComponentLink4URL=https://datasheet.ciiva.com/28450/1489800-28450377.pdf?src-supplier=Element14, ComponentLink5Description=https://datasheet.ciiva.com/176/mlccorderingcode-176349.pdf?src-supplier=Digi-Key, ComponentLink5URL=https://datasheet.ciiva.com/176/mlccorderingcode-176349.pdf?src-supplier=Digi-Key, ComponentLink6Description=https://datasheet.ciiva.com/176/mlccorderingcode-176348.pdf?src-supplier=Digi-Key, ComponentLink6URL=https://datasheet.ciiva.com/176/mlccorderingcode-176348.pdf?src-supplier=Digi-Key, ComponentLink7Description=https://datasheet.ciiva.com/176/mlccorderingcode-176350.pdf?src-supplier=Digi-Key, ComponentLink7URL=https://datasheet.ciiva.com/176/mlccorderingcode-176350.pdf?src-supplier=Digi-Key, Depth=0.5mm, Halogen Free="Halogen Free", Height=0.5mm, Item Type=Capacitor, Lead Free="Lead Free", Length=1mm, Manufacturer Part Number=CC0402KRX7R9BB103, Mount="Surface Mount", Packaging="Tape and Reel", Pricing 1="10000=0.00178 (USD)", Radiation Hardening=No, Reach SVHC Compliant=Yes, RoHS=Yes, RoHS Compliant=Yes, Series=CC, Stock 1=995000, Supplier 1=Avnet, Supplier Part Number 1=CC0402KRX7R9BB103, Termination=SMD/SMT, Thickness=0.022inch, Voltage Rating=50V, Voltage Rating (DC)=50V, Width=0.02inch
C27 C35 C36 C37 C42 C43 C44 C49 C50 C53 C54 C57 C58: library part CL10A106MA8NRNC, "CAP CER 10UF 25V X5R 0603", Case Code (Imperial)=0603, Case Code (Metric)=1608, Dielectric=X5R, LCSC Part Number=C96446, Manufacturer=Samsung, Max Operating Temperature=85°C, Min Operating Temperature=-55°C, Package Quantity=1, Tolerance=20%, Voltage Rating=25V, Capacitance=10uF, Case/Package=0603, Category="Ceramic Capacitors", ComponentLink1Description=https://datasheet.ciiva.com/25766/cl10a106ma8nrnc-25766562.pdf?src-supplier=Digi-Key, ComponentLink1URL=https://datasheet.ciiva.com/25766/cl10a106ma8nrnc-25766562.pdf?src-supplier=Digi-Key, Construction=Flat, Contact Plating=Tin, Lead Free="Lead Free", Length=0.063inch, Manufacturer Part Number=CL10A106MA8NRNC, Mount="Surface Mount", Packaging="Tape and Reel", Pricing 1="4000=0.03753, 8000=0.03700, 16000=0.03595, 24000=0.03515, 32000=0.03383, 40000=0.03304, 400000=0.03225 (USD)", RoHS=Yes, RoHS Compliant=Yes, Series=CL, Supplier 1=Avnet, Supplier Part Number 1=CL10A106MA8NRNC, Termination=Wraparound, Thickness=0.035inch, Width=0.031inch
C28 C29: library part CQ0402CRNPO9BN9R0, "CAP CER 9PF 50V C0G/NPO 0402", Case/Package=0402, LCSC Part Number=C577403, Manufacturer=Yageo, Max Operating Temperature=125°C, Min Operating Temperature=-55°C, Supplier Part Number=CQ0402CRNPO9BN9R0-ND, Voltage Rating=50V, Category="Ceramic Capacitors", ComponentLink1Description=http://www.yageo.com/documents/recent/UPY-High%20Q_NP0_16V-to-250V_13.pdf?src-supplier=Digikey, ComponentLink1URL=http://www.yageo.com/documents/recent/UPY-High%20Q_NP0_16V-to-250V_13.pdf?src-supplier=Digikey, Item Type=Capacitor, Manufacturer Part Number=CQ0402CRNPO9BN9R0, Mounting Technology="Surface Mount", Packaging="Tape and Reel", Pricing="10000=0.02594 (USD)", RoHS=Yes, Series=CQ, Supplier=Digikey
C30 C31: library part GJM1555C1H7R0BB01D, "CAP CER 7PF 50V C0G/NP0 0402", Case Code (Imperial)=0402, Case Code (Metric)=1005, Dielectric=C0G, LCSC Part Number=C161333, Manufacturer=Murata, Max Operating Temperature=125°C, Min Operating Temperature=-55°C, Package Quantity=10000, Supplier Part Number 1=81-GJM1555C1H7R0BB1D, Voltage Rating=50V, Capacitance=7pF, Case/Package=0402, Category="Ceramic Capacitors", ComponentLink1Description=https://datasheet.ciiva.com/5411/murata20gjm20series-202929-5411552.pdf?src-supplier=Mouser, ComponentLink1URL=https://datasheet.ciiva.com/5411/murata20gjm20series-202929-5411552.pdf?src-supplier=Mouser, ComponentLink2Description=https://datasheet.ciiva.com/11611/product-11611018.pdf?src-supplier=Avnet, ComponentLink2URL=https://datasheet.ciiva.com/11611/product-11611018.pdf?src-supplier=Avnet, Construction=Flat, Depth=0.5mm, Height=0.5mm, Length=1mm, Manufacturer Part Number=GJM1555C1H7R0BB01D, Mount="Surface Mount", Packaging="Tape and Reel", Pricing 1="1=0.20000, 10=0.08000, 50=0.08000, 100=0.06500, 500=0.04600, 1000=0.03900, 2500=0.03300, 10000=0.02900, 20000=0.02700, 50000=0.02400 (USD)", Radiation Hardening=No, RoHS=Yes, RoHS Compliant=Yes, Series=GJM, Stock 1=9136, Supplier 1=Mouser, Termination=SMD/SMT, Thickness=0.022inch, Voltage Rating (DC)=50V, Width=0.5mm
D1: "TVS DIODE 5.5VWM 6TSOP", Breakdown Voltage=6V, LCSC Part Number=C282546, Manufacturer=Nexperia, Max Operating Temperature=85°C, Min Operating Temperature=-40°C, Operating Supply Voltage=700mV, ComponentLink1Description=http://www.farnell.com/datasheets/1708221.pdf?src-supplier=Farnell, ComponentLink1URL=http://www.farnell.com/datasheets/1708221.pdf?src-supplier=Farnell, ComponentLink2Description=https://assets.nexperia.com/documents/data-sheet/IP4220CZ6.pdf?src-supplier=Digikey, ComponentLink2URL=https://assets.nexperia.com/documents/data-sheet/IP4220CZ6.pdf?src-supplier=Digikey, ComponentLink3Description=https://datasheet.octopart.com/IP4220CZ6%2C125-Nexperia-datasheet-10325773.pdf?src-supplier=Element14, ComponentLink3URL=https://datasheet.octopart.com/IP4220CZ6%2C125-Nexperia-datasheet-10325773.pdf?src-supplier=Element14, ComponentLink4Description=http://www.farnell.com/datasheets/1708221.pdf?src-supplier=Newark, ComponentLink4URL=http://www.farnell.com/datasheets/1708221.pdf?src-supplier=Newark, Item Type=ESD, Manufacturer Part Number=IP4220CZ6,125, Number of Channels=4NUMBER, Pins=6NUMBER, Pricing="3000=0.109, 9000=0.106, 12000=0.105, 30000=0.103, 45000=0.1 (USD)", RoHS=Yes, Stock=63000, Supplier="Future Electronics"
FB1: "FERRITE BEAD 220 OHM 0805 1LN", Case Code (Imperial)=0805, Case Code (Metric)=2012, Current=2A, DC Resistance (DCR)=45mR, LCSC Part Number=C85840, Manufacturer=Murata, Max Operating Temperature=125°C, Min Operating Temperature=-55°C, Package Quantity=1, Test Frequency=100MHz, Tolerance=25%, Case/Package=0805, ComponentLink1Description=https://datasheet.ciiva.com/30514/1845321-30514028.pdf?src-supplier=Jameco, ComponentLink1URL=https://datasheet.ciiva.com/30514/1845321-30514028.pdf?src-supplier=Jameco, ComponentLink2Description=https://datasheet.ciiva.com/1012/l0110s0100blm21p-1012288.pdf?src-supplier=Digikey, ComponentLink2URL=https://datasheet.ciiva.com/1012/l0110s0100blm21p-1012288.pdf?src-supplier=Digikey, ComponentLink3Description=https://datasheet.ciiva.com/11799/0900766b81275e31-11799232.pdf?src-supplier=Rs, ComponentLink3URL=https://datasheet.ciiva.com/11799/0900766b81275e31-11799232.pdf?src-supplier=Rs, ComponentLink4Description=https://datasheet.ciiva.com/29348/442529-da-01-en-chip-drossel-0805-220r-2000ma-2-0x1-25mm-29348007.pdf?src-supplier=Conrad, ComponentLink4URL=https://datasheet.ciiva.com/29348/442529-da-01-en-chip-drossel-0805-220r-2000ma-2-0x1-25mm-29348007.pdf?src-supplier=Conrad, ComponentLink5Description=https://datasheet.ciiva.com/8021/1756152-8021596.pdf?src-supplier=Element14, ComponentLink5URL=https://datasheet.ciiva.com/8021/1756152-8021596.pdf?src-supplier=Element14, ComponentLink6Description=https://datasheet.ciiva.com/8021/1756152-8021598.pdf?src-supplier=Element14, ComponentLink6URL=https://datasheet.ciiva.com/8021/1756152-8021598.pdf?src-supplier=Element14, ComponentLink7Description=https://datasheet.ciiva.com/14122/anblm21p-data-e-14122214.pdf?src-supplier=Distrelec, ComponentLink7URL=https://datasheet.ciiva.com/14122/anblm21p-data-e-14122214.pdf?src-supplier=Distrelec, ComponentLink8Description=https://datasheet.ciiva.com/1012/l0110s0100blm21p-1012287.pdf?src-supplier=Digikey, ComponentLink8URL=https://datasheet.ciiva.com/1012/l0110s0100blm21p-1012287.pdf?src-supplier=Digikey, ComponentLink9Description=https://datasheet.ciiva.com/1012/l0110s0100blm21p-1012289.pdf?src-supplier=Digikey, ComponentLink9URL=https://datasheet.ciiva.com/1012/l0110s0100blm21p-1012289.pdf?src-supplier=Digikey, ComponentLink10Description=https://datasheet.ciiva.com/3081/l0110s0100blm21p-3081655.pdf?src-supplier=Avnet, ComponentLink10URL=https://datasheet.ciiva.com/3081/l0110s0100blm21p-3081655.pdf?src-supplier=Avnet, ComponentLink11Description=https://datasheet.ciiva.com/16215/l0110s0100blm21p-16215194.pdf?src-supplier=Future+Electronics, ComponentLink11URL=https://datasheet.ciiva.com/16215/l0110s0100blm21p-16215194.pdf?src-supplier=Future+Electronics, Core Material=Ferrite, Current Rating=2A, DC Current=2A, DC Resistance-Max=45mR, Depth=1.25mm, Height=0.85mm, Impedance=220R, Item Type="Ferrite Beads", Lead Free="Lead Free", Length=2mm, Manufacturer Part Number=BLM21PG221SN1D, Material=Steel,Ferrite, Max Current Rating=2A, Max DC Current=2A, Military Standard=Not, Number of Lines=1, Packaging="Tape and Reel", Pins=2, Pricing="4000=0.0243, 12000=0.0237, 20000=0.0234, 40000=0.0231, 80000=0.0225 (USD)", Radiation Hardening=No, Reach SVHC Compliant=No, RoHS=Yes, RoHS Compliant=Yes, Series=BLM21P, Stock=612000, Supplier="Future Electronics", Termination=SMD/SMT, Width=1.25mm
FB2 FB4 FB5: "FERRITE BEAD 600 OHM 0603 1LN", Case Code (Imperial)=0603, Case Code (Metric)=1608, Current Rating=200mA, DC Resistance (DCR)=1R, ESR (Equivalent Series Resistance)=600R, LCSC Part Number=C85830, Manufacturer=Murata, Manufacturer Series=BLM18H, Max Operating Temperature=125°C, Min Operating Temperature=-55°C, Package Quantity=1, Test Frequency=100MHz, Tolerance=25%, Case/Package=0603, Channels=1, ComponentLink1Description=https://datasheet.ciiva.com/19458/1844993-19458415.pdf?src-supplier=Jameco, ComponentLink1URL=https://datasheet.ciiva.com/19458/1844993-19458415.pdf?src-supplier=Jameco, ComponentLink2Description=https://datasheet.ciiva.com/11800/0900766b811b5866-11800880.pdf?src-supplier=Rs, ComponentLink2URL=https://datasheet.ciiva.com/11800/0900766b811b5866-11800880.pdf?src-supplier=Rs, ComponentLink3Description=https://datasheet.ciiva.com/41449/001171708-da-01-en-chip-drossel0603-600r-200ma-1-6x0-8mm-41449386.pdf?src-supplier=Conrad, ComponentLink3URL=https://datasheet.ciiva.com/41449/001171708-da-01-en-chip-drossel0603-600r-200ma-1-6x0-8mm-41449386.pdf?src-supplier=Conrad, ComponentLink4Description=https://datasheet.ciiva.com/41449/001172283-da-01-en-drossel-0603-600r-1-6x0-8mm-4000st-41449622.pdf?src-supplier=Conrad, ComponentLink4URL=https://datasheet.ciiva.com/41449/001172283-da-01-en-drossel-0603-600r-1-6x0-8mm-4000st-41449622.pdf?src-supplier=Conrad, ComponentLink5Description=https://datasheet.ciiva.com/6212/l0110s0101blm18h-6212335.pdf?src-supplier=Digikey, ComponentLink5URL=https://datasheet.ciiva.com/6212/l0110s0101blm18h-6212335.pdf?src-supplier=Digikey, ComponentLink6Description=https://datasheet.ciiva.com/3081/l0110s0101blm18h-3081629.pdf?src-supplier=Avnet, ComponentLink6URL=https://datasheet.ciiva.com/3081/l0110s0101blm18h-3081629.pdf?src-supplier=Avnet, ComponentLink7Description=https://datasheet.ciiva.com/3082/l0110s0101blm18h-3082720.pdf?src-supplier=Avnet, ComponentLink7URL=https://datasheet.ciiva.com/3082/l0110s0101blm18h-3082720.pdf?src-supplier=Avnet, Core Material=Ferrite, DC Current=200mA, DC Resistance-Max=1R, Depth=0.8mm, Height=0.8mm, Impedance=600R, Item Type="Ferrite Beads", Lead Free="Lead Free", Length=1.6mm, Manufacturer Part Number=BLM18HG601SN1D, Material=Steel,Ferrite, Max Current Rating=200mA, Max DC Current=200mA, Number of Circuits=1, Number of Lines=1, Packaging="Tape and Reel", Pins=2, Pricing="4000=0.0428, 12000=0.0412, 20000=0.0405, 80000=0.0387, 120000=0.0375 (USD)", Radiation Hardening=No, Reach SVHC Compliant=No, RoHS=Yes, RoHS Compliant=Yes, Series=BLM18H, Stock=80000, Supplier="Future Electronics", Terminal Finish=Tin, Termination=SMD/SMT, Weight=7.1E-05oz, Width=0.8mm
FB3: "400mΩ ±25% 1kΩ@100MHz 0805 Ferrite Beads ROHS", LCSC Part Number=C44838, Manufacturer=FH, Package=0805, ComponentLink1Description=LCSC, ComponentLink1URL=https://www.lcsc.com/product-detail/Ferrite-Beads_FH-Guangdong-Fenghua-Advanced-Tech-CBW201209U102T_C44838.html, Item Type="Ferrite Bead", Manufacturer Part Number=CBW201209U102T
J1 J5: "TSM-106-X-SH-BOARDEDGE"
J2: library part X6511WV-02H-C60D30, "Gold 250V 3A Straight Square Pins 2.5mm 2P 260℃ 6mm -40℃~+105℃ 3mm 2.54mm Plugin Black Brass 1x2P Plugin,P=2.54mm Pin Headers ROHS", LCSC Part Number=C706874, Manufacturer=XKB, Package=Plugin,P=2.54mm, ComponentLink1Description=LCSC, ComponentLink1URL=https://www.lcsc.com/product-detail/Pin-Headers_XKB-Connectivity-X6511WV-02H-C60D30_C706874.html, Item Type="Male Header", Manufacturer Part Number=X6511WV-02H-C60D30
J3: "CONN RCPT USB2.0 MICRO B SMD R/A", Current Rating=1.8A, LCSC Part Number=C136000, Manufacturer=Molex, Max Operating Temperature=85°C, Max Voltage Rating (AC)=30V, Min Operating Temperature=-30°C, ComponentLink1Description=https://datasheet.ciiva.com/3094/1050170001-io-connectors-3094416.pdf?src-supplier=Avnet, ComponentLink1URL=https://datasheet.ciiva.com/3094/1050170001-io-connectors-3094416.pdf?src-supplier=Avnet, ComponentLink2Description=https://datasheet.ciiva.com/4598/1050170001-io-connectors-152207-4598759.pdf?src-supplier=Mouser, ComponentLink2URL=https://datasheet.ciiva.com/4598/1050170001-io-connectors-152207-4598759.pdf?src-supplier=Mouser, ComponentLink3Description=https://datasheet.ciiva.com/851/1050170001-sd-851276.pdf?src-supplier=Digikey, ComponentLink3URL=https://datasheet.ciiva.com/851/1050170001-sd-851276.pdf?src-supplier=Digikey, ComponentLink4Description=https://datasheet.ciiva.com/851/1050170001-sd-851277.pdf?src-supplier=Digikey, ComponentLink4URL=https://datasheet.ciiva.com/851/1050170001-sd-851277.pdf?src-supplier=Digikey, ComponentLink5Description=https://datasheet.ciiva.com/851/1050170001-sd-851278.pdf?src-supplier=Digikey, ComponentLink5URL=https://datasheet.ciiva.com/851/1050170001-sd-851278.pdf?src-supplier=Digikey, ComponentLink6Description=https://datasheet.ciiva.com/16668/1050170001-io-connectors-16668598.pdf?, ComponentLink6URL=https://datasheet.ciiva.com/16668/1050170001-io-connectors-16668598.pdf?, Connector Type=USB, Contact Material="Copper Alloy,Copper", Contact Plating=Gold, Depth=7.5mm, Gender=Receptacle, Halogen Free=5696HalogenFree, Housing Material=Polymer, Item Type="USB Connectors", Length=8.2mm, Manufacturer Part Number=1050170001, Mounting Technology="Surface Mount", Number of Circuits=5, Number of Contacts=5, Number of Ports=1, Number of Positions=5, Number of Rows=1NUMBER, Orientation="Right Angle", Packaging="Tape and Reel", Pitch=0.65mm, Plating=157ConductorMaterial, Pricing="1=1.01, 10=0.84, 50=0.84, 100=0.7, 1000=0.56, 10000=0.495 (USD)", Reach SVHC Compliant=Unknown, RoHS=Yes, RoHS Compliant=Yes, Series=105017, Stock=21424, Supplier=Mouser, Termination=Solder, USB Standard="USB 2.0", Voltage Rating=30V
J4: library part B4B-XH-A(LF)(SN), "CONN HEADER VERT 4POS 2.5MM", Color=Natural, Contact Resistance=20mR, Current Rating=3A, Housing Color=White, Insulation Resistance=1GR, LCSC Part Number=C144395, Manufacturer=JST, Max Operating Temperature=85°C, Max Voltage Rating (AC)=250V, Min Operating Temperature=-25°C, Package Quantity=500, Supplier Part Number 1=8134090, Category="FFC / FPC", ComponentLink1Description=https://datasheet.ciiva.com/26894/getdatasheetpartid-455616-26894787.pdf?src-supplier=Verical, ComponentLink1URL=https://datasheet.ciiva.com/26894/getdatasheetpartid-455616-26894787.pdf?src-supplier=Verical, ComponentLink2Description=https://datasheet.ciiva.com/26924/getdatasheetpartid-640571-26924035.pdf?src-supplier=Verical, ComponentLink2URL=https://datasheet.ciiva.com/26924/getdatasheetpartid-640571-26924035.pdf?src-supplier=Verical, ComponentLink3Description=https://datasheet.ciiva.com/16203/b4b-xh-alfsn-16203642.pdf?src-supplier=Future+Electronics, ComponentLink3URL=https://datasheet.ciiva.com/16203/b4b-xh-alfsn-16203642.pdf?src-supplier=Future+Electronics, ComponentLink4Description=https://datasheet.ciiva.com/726/exh-726404.pdf?src-supplier=Digi-Key, ComponentLink4URL=https://datasheet.ciiva.com/726/exh-726404.pdf?src-supplier=Digi-Key, Connector Type="Male Pin", Contact Material=Brass, Contact Plating=Tin,Copper,Lead, Depth=5.75mm, Gender=Male, Housing Material=Polyamide, Item Type="JST Connector", Lead Free="Lead Free", Lead Pitch=2.5mm, Length=12.4mm, Manufacturer Part Number=B4B-XH-A(LF)(SN), Material=Polyamide, Max Current Rating=3A, Max Voltage Rating (DC)=250V, Mount="Through Hole", Number of Contacts=4, Number of Positions=4, Number of Rows=1, Orientation=Straight, Packaging=Bulk, Pitch=2.5mm, Pricing 1="1=0.13000, 300=0.11300, 1000=0.11000, 3000=0.10700, 10000=0.10400 (USD)", REACH SVHC="No SVHC", RoHS=Yes, Supplier 1="Future Electronics", Termination=Press-Fit, Voltage Rating=250V, Voltage Rating (AC)=250V, Wire/Cable Gauge=22AWG
J6 J7 J8 J9 J10 J11 J12 J13 J14 J15 J16 J17: "CONN MICRO SD CARD PUSH-PUSH R/A", Current Rating=500mA, Insulation Resistance=1GR, LCSC Part Number=C2680620, Manufacturer="Wurth Electronics", Max Operating Temperature=85°C, Min Operating Temperature=-25°C, Operating Supply Voltage=100V, Package Quantity=1, ComponentLink1Description=https://datasheet.ciiva.com/6935/693071010811-6935152.pdf?src-supplier=Digikey, ComponentLink1URL=https://datasheet.ciiva.com/6935/693071010811-6935152.pdf?src-supplier=Digikey, ComponentLink2Description=https://datasheet.ciiva.com/25605/0900766b81113f2e-25605369.pdf?src-supplier=Rs, ComponentLink2URL=https://datasheet.ciiva.com/25605/0900766b81113f2e-25605369.pdf?src-supplier=Rs, ComponentLink3Description=https://datasheet.ciiva.com/1104/1759178-1104796.pdf?src-supplier=Element14, ComponentLink3URL=https://datasheet.ciiva.com/1104/1759178-1104796.pdf?src-supplier=Element14, ComponentLink4Description=https://datasheet.ciiva.com/6935/693071010811-6935146.pdf?src-supplier=Digikey, ComponentLink4URL=https://datasheet.ciiva.com/6935/693071010811-6935146.pdf?src-supplier=Digikey, Contact Material="Copper Alloy,Copper,Gold", Contact Plating=Gold, Height=1.98mm, Item Type="Memory Connectors", Lead Free="Lead Free", Length=14mm, Manufacturer Part Number=693071010811, Memory Format=4498,11064MemoryType, Mounting Technology="Surface Mount", Number of Contacts=8, Packaging="Cut Tape", Pricing="1=3.11, 10=3.04, 50=2.68, 100=2.56, 1000=2.19, 10000=2 (USD)", Reach SVHC Compliant=Unknown, RoHS=Yes, RoHS Compliant=Yes, Series=-, Stock=22534, Supplier=Mouser, Voltage Rating=100V, Width=15.2mm
LED1: library part NCD0603R3, "RED LED 0603 Light Emitting Diodes", LCSC Part Number=C3151730, Manufacturer="Foshan NationStar Optoelectronics", Package=0603, ComponentLink1Description=LCSC, ComponentLink1URL=https://www.lcsc.com/product-detail/Light-Emitting-Diodes-LED_Foshan-NationStar-Optoelectronics-NCD0603R3_C3151730.html, Item Type=LED, Manufacturer Part Number=NCD0603R3
LED2: library part NCD0603G2, "Emerald 0603 Light Emitting Diodes (LED) ROHS", LCSC Part Number=C87326, Manufacturer="Foshan NationStar Optoelectronics", Package=0603, ComponentLink1Description=LCSC, ComponentLink1URL=https://www.lcsc.com/product-detail/Light-Emitting-Diodes-LED_Foshan-NationStar-Optoelectronics-NCD0603G2_C87326.html, Item Type=LED, Manufacturer Part Number=NCD0603G2
Q1 Q3 Q6: "50V 130mA 5Ω@10V,100mA 225mW 2V@250uA 1 Piece P-Channel SC-70 MOSFETs ROHS", LCSC Part Number=C383208, Manufacturer=LRC, Package=SC-70, ComponentLink1Description=LCSC, ComponentLink1URL=https://www.lcsc.com/product-detail/MOSFETs_LRC-LBSS84WT1G_C383208.html, Item Type=MOSFETs, Manufacturer Part Number=LBSS84WT1G
Q2: "100V 200mA 300mW 1.06Ω@10V,200mA 3V@250uA N Channel SOT-23 MOSFETs ROHS", LCSC Part Number=C431506, Manufacturer=BORN, Package=SOT-23, ComponentLink1Description=LCSC, ComponentLink1URL=https://www.lcsc.com/product-detail/MOSFETs_BORN-BSS123_C431506.html, Item Type=Mosfet, Manufacturer Part Number=BSS123